# Altium PCB PCB1.PcbDoc
Units mil, origin at the board's own origin, x right, y up, seen from the top; angles counter-clockwise.
Board outline 3280 x 2470 mil, 2 copper layers (Top Layer, Bottom Layer); 51 components, 30 nets, 184 pads, 29 vias.
Unrouted connection lines stored in the file: 25.
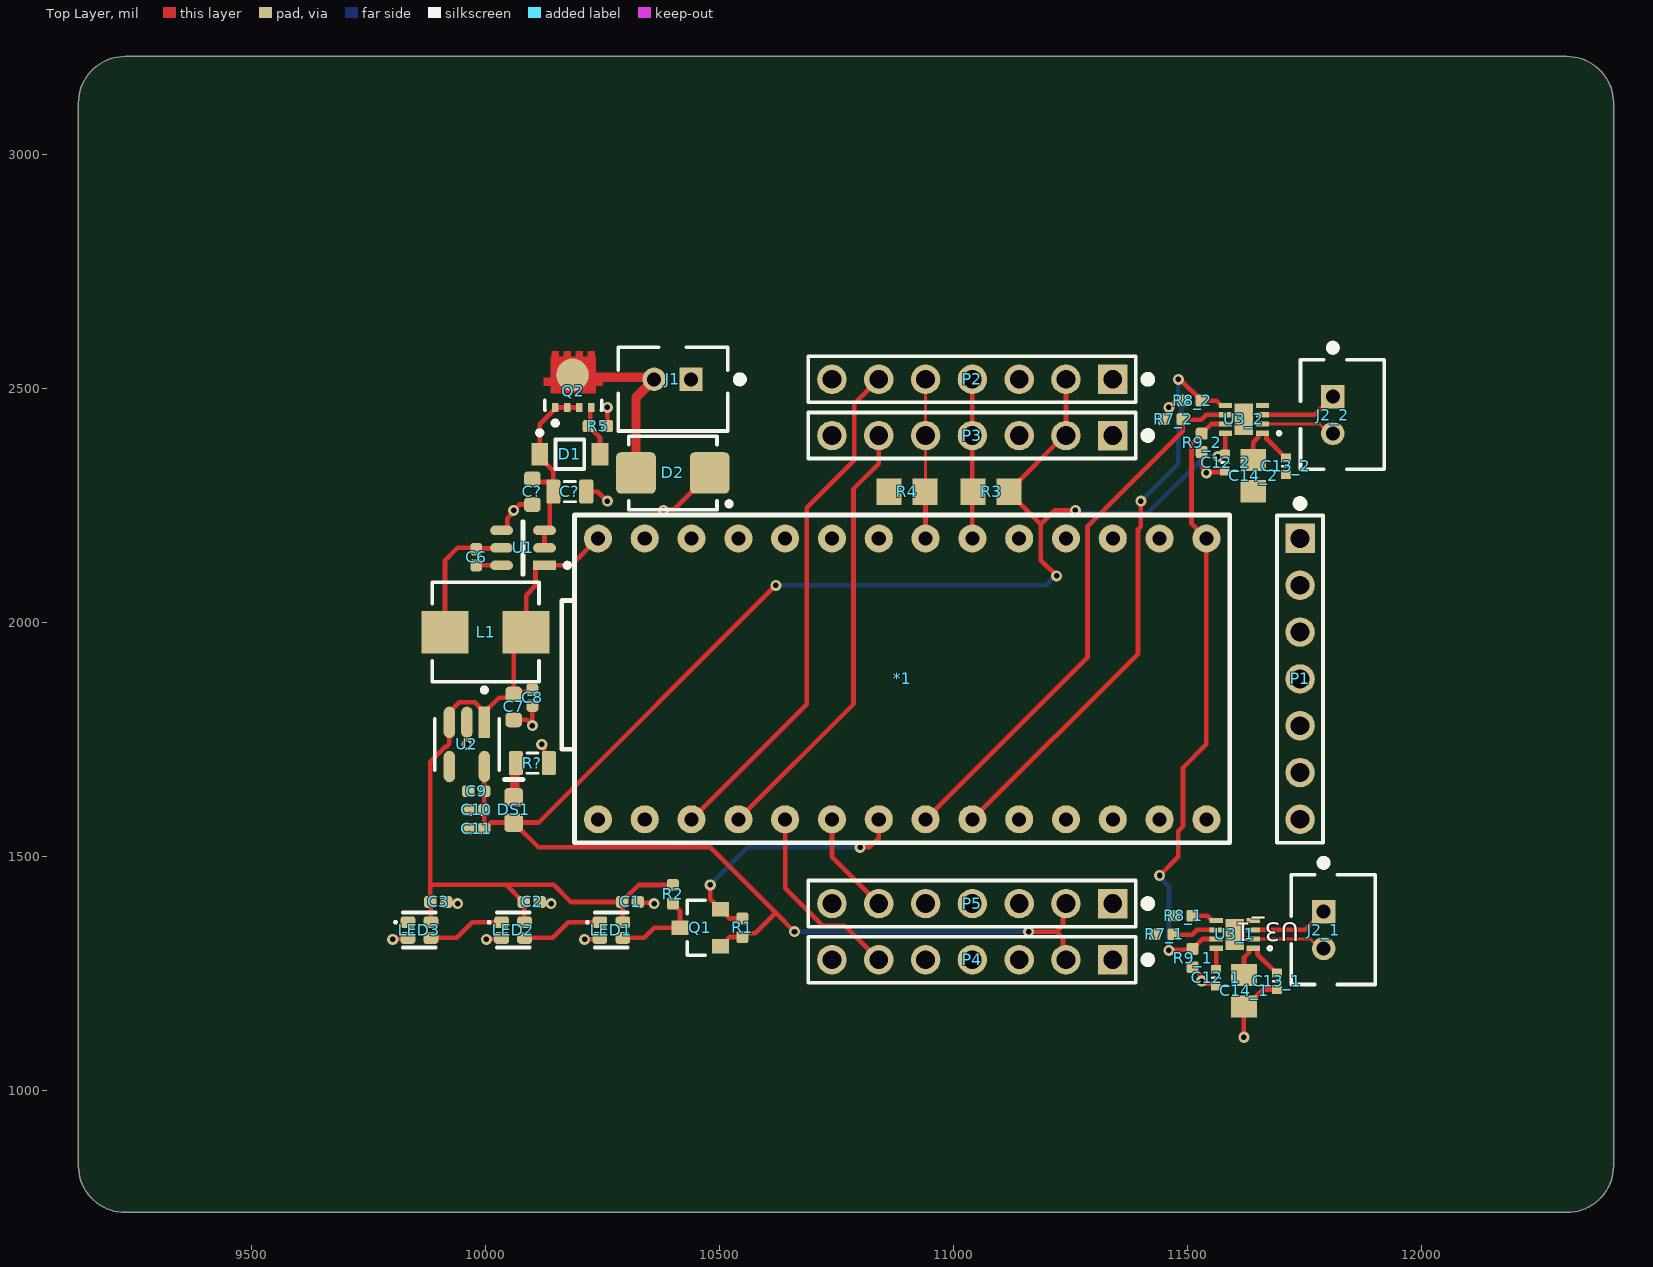
[diagram p0: Top Layer view]
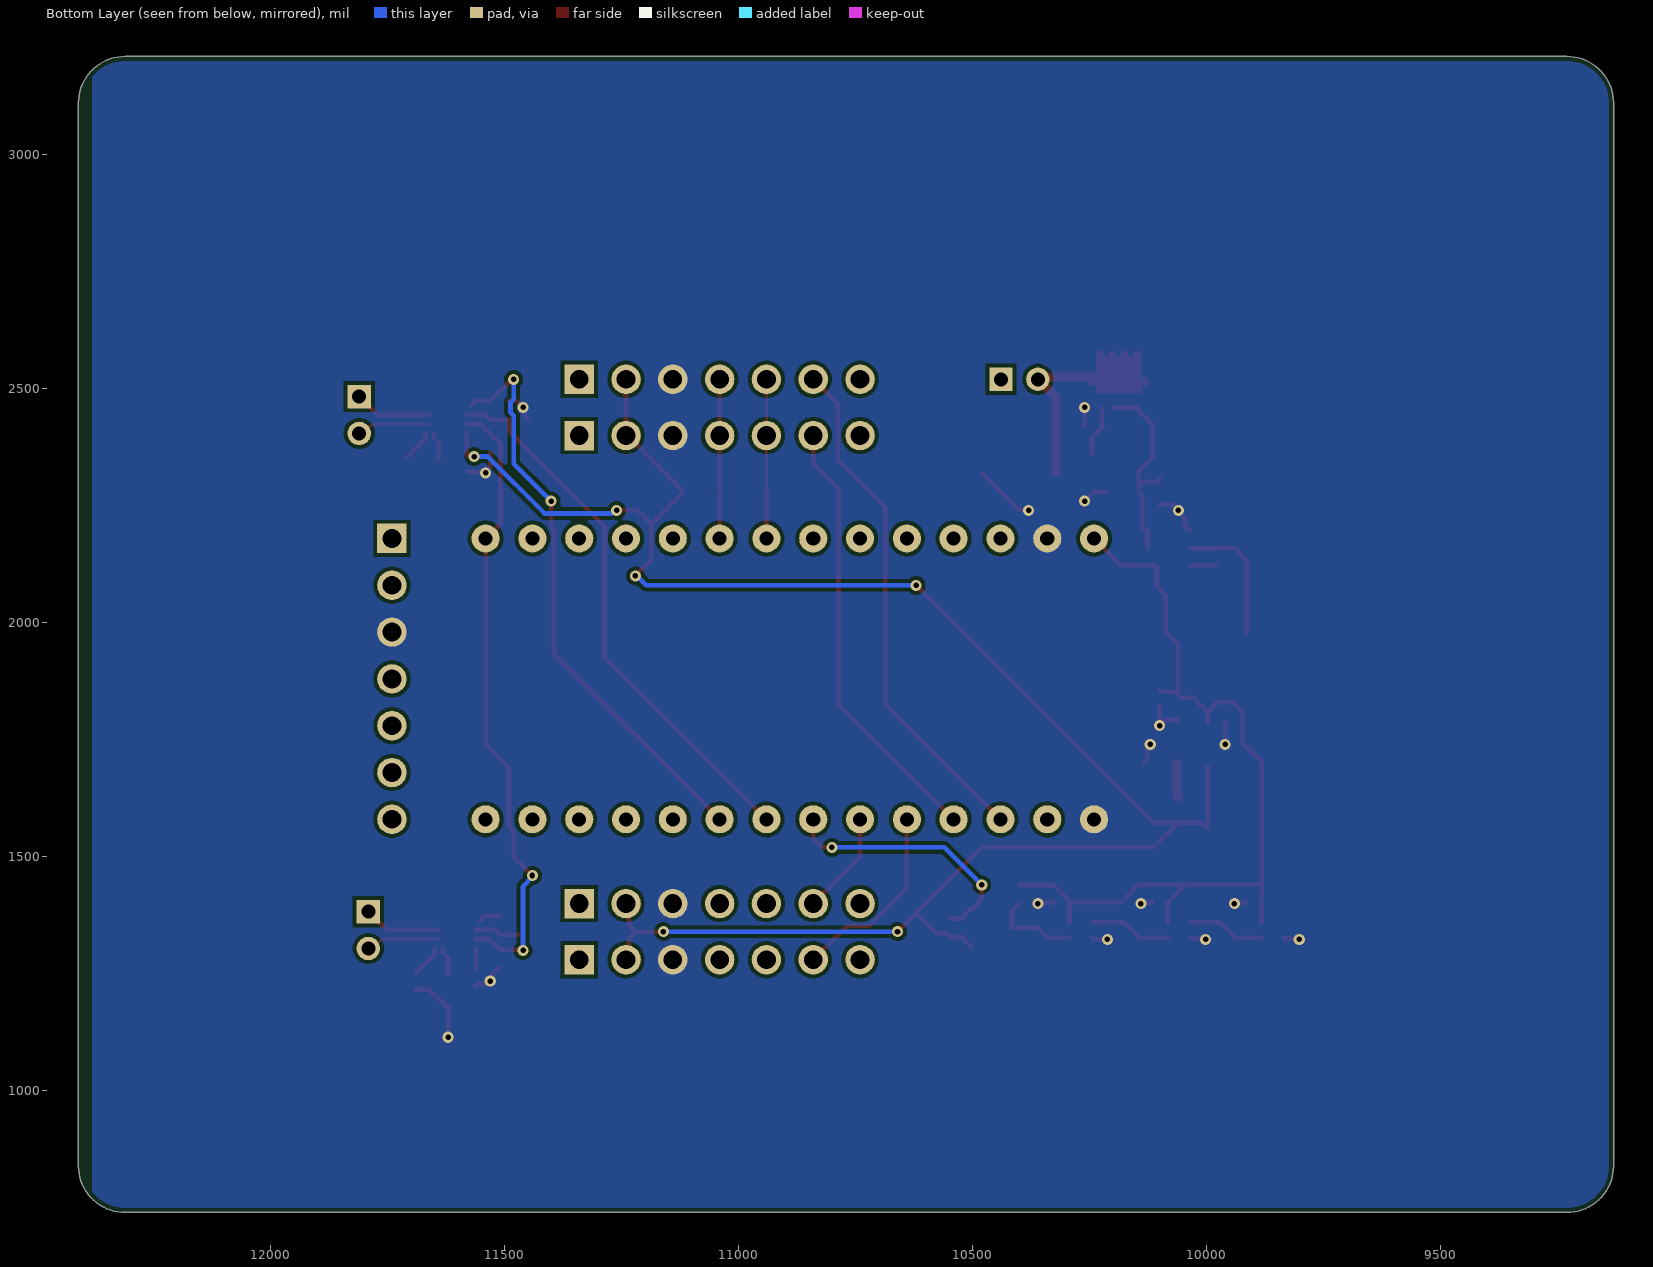
[diagram p1: Bottom Layer view, seen from below]
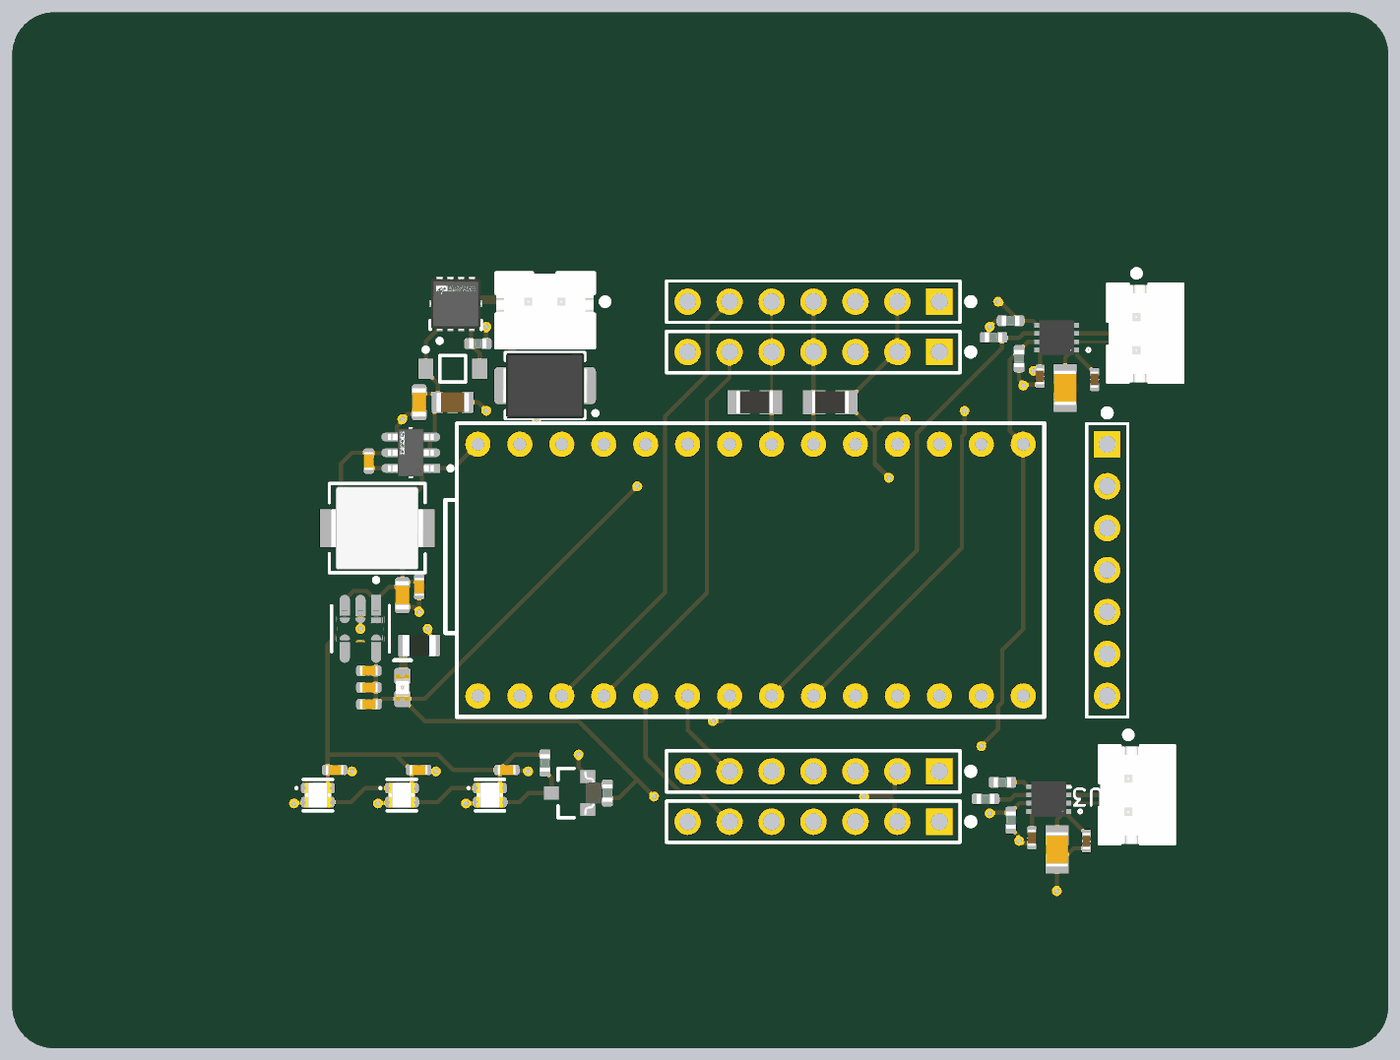
[diagram p2: 3D render of the assembled board from above, using the file's embedded part models]

## Layer stack, top to bottom
Top Solder: solder mask 0.4, Solder Resist, Dk 3.5
Top Layer: signal copper 1.4
Dielectric 1: dielectric 12.6, FR-4, Dk 4.8
Bottom Layer: signal copper 1.4
Bottom Solder: solder mask 0.4, Solder Resist, Dk 3.5

## Board outline
9130,840 ccw(c9230,840) 9230,740 12310,740 ccw(c12310,840) 12410,840 12410,3110 ccw(c12310,3110) 12310,3210 9230,3210 ccw(c9230,3110) 9130,3110

## Design rules (kind name [scope] priority, off if disabled: settings)
BoardOutlineClearance [All] p1: gap=10 ignorepadtopadclearanceinfootprint=FALSE except(0: Arc-SplitContinuation Track-SplitContinuation SMDPad-SplitContinuation THPad-SplitContinuation Via-SplitContinuation Fill-SplitContinuation Poly-SplitContinuation Region-SplitContinuation Text-SplitContinuation)
Clearance [All] p1: gap=7.87 ignorepadtopadclearanceinfootprint=TRUE except(3.94: Arc-SMDPad Track-SMDPad; 5.91: Arc-Text Track-Text SMDPad-SMDPad SMDPad-Text THPad-Text Via-Text Fill-Text Poly-Text Region-Text; 9.84: Arc-Via Track-Via; 10: SMDPad-THPad SMDPad-Via THPad-THPad THPad-Via Via-Via Text-Text; 11.02: Arc-THPad Track-THPad)
DiffPairsRouting [All] p1: maxlimit=7.87 minlimit=7.87 mostfreqgap=7.87 toplayer_minwidth=15 toplayer_maxwidth=21.19 toplayer_prefwidth=21.19 bottomlayer_minwidth=15 bottomlayer_maxwidth=21.19 bottomlayer_prefwidth=21.19 impedanceprofiledriven=TRUE impedanceprofileid={89AA14D4-A2A4-49F1-A537-A2CA9A9DB853} maxuncoupledlength=500
Height [All] p1: minheight=0 maxheight=99999 prefheight=500
HoleSize [All] p1: absolutevalues=TRUE maxlimit=196.85 minlimit=1 maxpercent=80.000 minpercent=20.000
MinimumSolderMaskSliver [All] p1: minsoldermaskwidth=3.94
PlaneConnect [All] p1: planeconnectstyle=Direct reliefexpansion=20 reliefentries=4 reliefconductorwidth=10 reliefairgap=10
PolygonConnect [All] p1: connectstyle=Direct reliefconductorwidth=10 reliefentries=4 polygonreliefangle="90 Angle" airgapwidth=10
RoutingVias [All] p1: holewidth=11.81 width=23.62 viastyle="Through Hole" minholewidth=11.81 minwidth=19.68 maxholewidth=11.81 maxwidth=31.5
SilkToSolderMaskClearance [IsPad] p1: minsilkscreentomaskgap=2.01 clearancetoexposedcopper=TRUE
SolderMaskExpansion [All] p1: expansion=1.5 istentingtop=FALSE
SupplyNets "Schematic Supply Nets_12" [InNet('P5V0')] p1: voltage=0.000
SupplyNets "Schematic Supply Nets_11" [InNet('VINUP')] p2: voltage=0.000
SupplyNets "Schematic Supply Nets_1" [InNet('VIN')] p3: voltage=0.000
SupplyNets "Schematic Supply Nets_6" [InNet('GND')] p4: voltage=0.000
SupplyNets "Schematic Supply Nets_2" [InNet('P3V3')] p5: voltage=0.000
UnRoutedNet [All] p1: checkbadconnections=TRUE
Width [All] p1: maxlimit=590.55 minlimit=6.3 preferedwidth=10 minimp=50.000000 maximp=50.000000 favimp=50.000000
23 further rules are at their usual default settings.

## Classes and differential pairs
channel class MotorControl: U_MotorControl1 U_MotorControl2
component class U_Power: C6 C7 C8 C9 C10 C11 C? D1 D2 DS1 J1 L1 Q2 R5 R? U1 U2
component class U_MotorControl2: C12_2 C13_2 C14_2 J2_2 R7_2 R8_2 R9_2 U3_2
component class U_MotorControl1: C12_1 C13_1 C14_1 J2_1 R7_1 R8_1 R9_1 U3_1
component class U_Microcontroller: *1
component class U_GPIO: C1 C2 C3 LED1 LED2 LED3 P1 P2 P3 P4 P5 Q1 R1 R3 R4

## Components (designator, comment, footprint, x,y, rotation, side; value= is the part's Value field where it differs from the comment)
*1 "TEENSY40" TEENSY40-Footprint-1 10190,1530 r0 top
C1 "100n 16V X7R 0402" C0402 10308.64,1403.37 r0 top value=100nF
C2 "100n 16V X7R 0402" C0402 10098.64,1403.37 r0 top value=100nF
C3 "100n 16V X7R 0402" C0402 9898.64,1403.37 r0 top value=100nF
C6 "100n 16V X7R 0402" C0402 9980,2140 r270 top value=100nF
C7 "22uF 10V 0603 X5R" C0603 10060,1820 r270 top value=22uF
C8 "1uF 16V X5R 0402" C0402 10100,1840 r270 top value=1u
C9 "1uF 16V X5R 0402" C0402 9980,1640 r180 top value=1u
C10 "1uF 16V X5R 0402" C0402 9980,1600 r180 top value=1u
C11 "1uF 16V X5R 0402" C0402 9980,1560 r180 top value=1u
C12_1 "Capacitor 100nF +/-20% 25V 0402" CAPC0402(1005)60_L 11560.5,1241.68 r90 top value=100nF (schematic designator C12)
C12_2 "Capacitor 100nF +/-20% 25V 0402" CAPC0402(1005)60_L 11580,2342.15 r90 top value=100nF (schematic designator C12)
C13_1 "Capacitor 100nF +/-20% 25V 0402" CAPC0402(1005)60_L 11690.5,1233.96 r90 top value=100nF (schematic designator C13)
C13_2 "Capacitor 100nF +/-20% 25V 0402" CAPC0402(1005)60_L 11710,2334.44 r90 top value=100nF (schematic designator C13)
C14_1 "Capacitor 10 uF +/- 10% 16 V 0805" CAPC2013X135X45NL10T25 11620.5,1213.96 r90 top value=10µF (schematic designator C14)
C14_2 "Capacitor 10 uF +/- 10% 16 V 0805" CAPC2013X135X45NL10T25 11640,2314.44 r90 top value=10µF (schematic designator C14)
C? "Capacitor 47µF +/-40% 6.3V 0805" CAPC0805(2012)145_L 10180,2280 r0 top value=47µF
C? "10uF 35V 0603" C0603 10100,2280 r270 top value=10u
D1 "MMSZ10T1G" ONSC-SOD-123-2-425-04_V 10180,2360 r0 top
D2 "SMBJ17CA" DO214-AA 10400,2320 r180 top
DS1 "KT-0603W" LED0603 10060,1600 r90 top
J1 "CONN-00048" JST_PHR_2_0 10438.74,2520 r180 top
J2_1 "CONN-00048" JST_PHR_2_0 11790.5,1382.7 r270 top (schematic designator J2)
J2_2 "CONN-00048" JST_PHR_2_0 11810,2483.18 r270 top (schematic designator J2)
L1 "4.7uH 4.5A FXL0530-4R7-M" INDP5452X30N 10000,1980 r0 top value=4u7
LED1 "XL-1615RGBC-WS2812B" XL-1615RGBC-WS2812B-Footprint-1 10268.64,1343.37 r0 top
LED2 "XL-1615RGBC-WS2812B" XL-1615RGBC-WS2812B-Footprint-1 10058.64,1343.37 r0 top
LED3 "XL-1615RGBC-WS2812B" XL-1615RGBC-WS2812B-Footprint-1 9858.64,1343.37 r0 top
P1 "CONN-00105" HDDR_7x1_0 11740,1880 r270 top
P2 "CONN-00105" HDDR_7x1_0 11040,2520 r180 top
P3 "CONN-00105" HDDR_7x1_0 11040,2400 r180 top
P4 "CONN-00105" HDDR_7x1_0 11040,1280 r180 top
P5 "CONN-00105" HDDR_7x1_0 11040,1400 r180 top
Q1 "2N7002H6327XTSA2" FP-PG-SOT23-3-MFG 10458.64,1348.37 r180 top
Q2 "AONR21321" FP-DFN3x3A_8L_EP1_P-MFG 10187.2,2515.12 r0 top
R1 "1k 1% 0402" R0402 10548.64,1348.37 r90 top value=1k
R2 "1k 1% 0402" R0402 10400,1420 r270 top value=1k
R3 "Resistor 4k7 +/-1% 0805 125 mW" RESC2013X70X40ML20T20 11080,2280 r0 top value=4.7k
R4 "Resistor 4k7 +/-1% 0805 125 mW" RESC2013X70X40ML20T20 10900,2280 r180 top value=4.7k
R5 "10k 1% 0402" R0402 10240,2420 r180 top value=10k
R7_1 "10k 1% 0402" R0402 11450,1334.44 r0 top value=10k (schematic designator R7)
R7_2 "10k 1% 0402" R0402 11469.5,2434.91 r0 top value=10k (schematic designator R7)
R8_1 "10k 1% 0402" R0402 11490.5,1373.96 r0 top value=10k (schematic designator R8)
R8_2 "10k 1% 0402" R0402 11510,2474.44 r0 top value=10k (schematic designator R8)
R9_1 "10k 1% 0402" R0402 11510.5,1283.65 r90 top value=10k (schematic designator R9)
R9_2 "10k 1% 0402" R0402 11530,2384.12 r90 top value=10k (schematic designator R9)
R? "Resistor 1K +/-5% 0805 125 mW" RESC0805(2012)_L 10100,1700 r0 top value=1k
U1 "AP63205WU-7" FP-TSOT26-IPC_B 10080,2160 r180 top
U2 "AP2112K-3.3TRG1" FP-SOT25-IPC_A 9960,1740 r270 top
U3_1 "DRV8212PDSGR" WSON8_DSG_TEX 11600.5,1333.96 r180 top (schematic designator U3)
U3_2 "DRV8212PDSGR" WSON8_DSG_TEX 11620,2434.44 r180 top (schematic designator U3)

## Footprints (in the part's own frame and the unit in brackets; to place one, negate y for a bottom-side part, rotate by r counter-clockwise, add the part's x,y. Pads: shape width x height; smd on the part's side, far side on the other; paste and mask are expansions set on the pad)
C0402 [mm] "Chip Capacitor, 2-Leads, Body 1.00x0.50mm, IPC Medium Density"
  rrect50% 0.68x0.64 smd: 1(-0.43,0) 2(0.43,0)
  body extent -0.55,-0.3 0.55,0.3, height 0.6
C0603 [mm] "Chip Capacitor, 2-Leads, Body 1.60x0.75mm, IPC Medium Density"
  rrect50% 0.8x0.9 smd: 1(-0.7,0) 2(0.7,0)
  body extent -0.87,-0.43 0.87,0.43, height 0.8
CAPC0402(1005)60_L [mm] "Chip Capacitor, Body 1.0x0.5mm, Height 0.6mm, IPC High Density"
  rrect25% 0.5x0.55 smd: 1(-0.45,0) 2(0.45,0)
  silkscreen extent 0,-0.2 0,0.2, body extent -0.5,-0.25 0.5,0.25, height 0.6
CAPC0805(2012)145_L [mm] "Chip Capacitor, Body 2.0x1.2mm, Height 1.45mm, IPC High Density"
  rrect25% 0.76x1.3 smd: 1(-0.9,0) 2(0.89,0)
  silkscreen extent -0.3,-0.55 0.3,0.55, body extent -1,-0.6 1,0.6, height 1.45
CAPC2013X135X45NL10T25 [mm] "Chip Capacitor, 2-Leads, Body 2.10x1.35mm, IPC Medium Density"
  rect 1.2x1.4 smd: 1(-0.85,0) 2(0.85,0)
  body extent -1.05,-0.67 1.05,0.67, height 1.35
DO214-AA [mm] "DO214-AA Diode Package"
  rrect25% 2.16x2.25 smd: 1(-2,0) 2(2,0)
  silkscreen extent -3.18,-2 2.4,2, body extent -2.6,-1.97 2.6,1.97, height 2.61
FP-DFN3x3A_8L_EP1_P-MFG [mm]
  rect 0.35x0.5 smd paste+0 mask+0: 1(-0.975,-1.4) 2(-0.325,-1.4) 3(0.325,-1.4) 4(0.975,-1.4)
  round 1.769 smd paste+0 mask+0: 5-6-7-8(-0.038,0.367)
  Top Layer region: -1.225,-0.63 -1.225,-0.215 -1.605,-0.215 -1.605,0.215 -1.225,0.215 -1.225,1.35 -1.175,1.35 -1.175,1.65 -0.775,1.65 -0.775,1.35 -0.525,1.35 -0.525,1.65 -0.125,1.65 -0.125,1.35 0.125,1.35 0.125,1.65 0.525,1.65 0.525,1.35 0.775,1.35 0.775,1.65 1.175,1.65 1.175,1.35 1.225,1.35 1.225,0.215 1.605,0.215 1.605,-0.215 1.225,-0.215 1.225,-0.63
  silkscreen extent -1.55,-2.37 1.55,-1.01, body extent -1.71,-1.75 1.71,1.75, height 0.25
FP-PG-SOT23-3-MFG [mm]
  rect 0.9x0.8 smd paste+0 mask+0: 1(-1.1,1) 2(-1.1,-1) 3(1.1,0)
  silkscreen extent -0.28,-1.5 0.7,1.5, body extent -1.65,-1.6 1.65,1.6, height 0.25
FP-SOT25-IPC_A [mm]
  rect 1.707x0.616 smd paste+0 mask+0: 1(-1.201,0.95)
  rrect100% 1.707x0.616 smd paste+0 mask+0: 2(-1.201,0) 3(-1.201,-0.95) 4(1.201,-0.95) 5(1.201,0.95)
  silkscreen extent -3.08,-1.75 1.4,1.75, body extent -2.55,-2 2.55,2, height 0.25
FP-TSOT26-IPC_B [mm]
  rect 1.24x0.526 smd paste+0 mask+0: 1(-1.165,0.95)
  rrect100% 1.24x0.526 smd paste+0 mask+0: 2(-1.165,0) 3(-1.165,-0.95) 4(1.166,-0.95) 5(1.166,0) 6(1.166,0.95)
  silkscreen extent -2.53,-1.45 0.05,1.45, body extent -2.04,-1.7 2.04,1.7, height 0.25
HDDR_7x1_0 [mm]
  rect 1.6x1.6 hole 1.016: 1(-7.62,0)
  round 1.6 hole 1.016: 2(-5.08,0) 3(-2.54,0) 4(0,0) 5(2.54,0) 6(5.08,0) 7(7.62,0)
  silkscreen extent -9.72,-1.25 8.9,1.25, body extent -8.89,-1.27 8.89,1.27, height 8.54
INDP5452X30N [mm] "Precision Wire Wound Inductor, 2-Leads, Body 5.40x5.20mm, IPC Medium Density"
  rect 2.55x2.3 smd: 1(-2.2,0) 2(2.2,0)
  silkscreen extent -2.9,-2.7 2.9,2.7, body extent -2.8,-2.5 2.8,2.5, height 3
JST_PHR_2_0 [mil]
  rect 50x50 hole 30: 1(0,0)
  round 50 hole 30: 2(78.74,0)
  silkscreen extent -112,-69 156,110, body extent -77,-69 156,110, height 236
LED0603 [mm] "0603 LED"
  rrect35% 1x1 smd: 1(0.685,0) 2(-0.685,0)
  silkscreen extent 1.65,-0.51 1.65,0.51, body extent -0.8,-0.4 0.8,0.4, height 0.55
ONSC-SOD-123-2-425-04_V [mm] "SOD, 2-Leads, Body 2.69x1.6mm"
  rect 0.91x1.22 smd: 1(-1.635,0) 2(1.635,0)
  silkscreen extent -1.76,-0.8 0.78,1.28, body extent -1.35,-0.8 1.35,0.8, height 1.35
R0402 [mm] "R0402"
  rrect35% 0.65x0.65 smd: 1(-0.5,0) 2(0.5,0)
  body extent -0.53,-0.29 0.53,0.29, height 0.38
RESC0805(2012)_L [mm] "Chip Resistor, Body 2.0x1.3mm, IPC High Density"
  rrect25% 0.76x1.3 smd: 1(-0.9,0) 2(0.89,0)
  silkscreen extent -0.3,-0.55 0.3,0.55, body extent -1,-0.62 1,0.63, height 0.6
RESC2013X70X40ML20T20 [mm] "Chip Resistor, 2-Leads, Body 2.2x1.35mm, IPC Low Density"
  rect 1.35x1.45 smd: 1(-0.975,0) 2(0.975,0)
  body extent -1.1,-0.67 1.1,0.67, height 0.7
TEENSY40-Footprint-1 [mil]
  round 60 hole 30: 0(150,50) 1(250,50) 2(350,50) 3(450,50) 3V3(250,650) 4(550,50) 5(650,50) 6(750,50) 7(850,50) 8(950,50) 9(1050,50) 10(1150,50) 11(1250,50) 12(1350,50) 13(1350,650) 14(1250,650) 15(1150,650) 16(1050,650) 17(950,650) 18(850,650) 19(750,650) 20(650,650) 21(550,650) 22(450,650) 23(350,650) GND1(50,50) GND2(150,650) Vin(50,650)
  silkscreen extent -28,0 1400,700
WSON8_DSG_TEX [mil]
  rect 28x11 smd paste+0 mask+0: 1(-39.5,29.53) 2(-39.5,9.84) 3(-39.5,-9.84) 4(-39.5,-29.53) 5(39.5,-29.53) 6(39.5,-9.84) 7(39.5,9.84) 8(39.5,29.53)
  rect 39x67 smd paste+0 mask+0: 9(0,0)
  silkscreen extent -79,26 -71,34, body extent -41,-41 41,41, height 32
XL-1615RGBC-WS2812B-Footprint-1 [mm]
  rrect50% 0.8x0.65 smd mask+0.05: 1(-0.625,0.425) 2(0.625,0.425) 3(-0.625,-0.425) 4(0.625,-0.425)
  silkscreen extent -1.36,-0.95 0.89,0.95, body extent -0.8,-0.75 0.8,0.75, height 0.7

## Part data
*1: library part CMP-020-00024-3, "PJRC Teensy 4.0 USB Development Board"
C1 C2 C3 C6: library part CMP-001-00088-6, "100nF 16V X7R ±10% 0402 Multilayer Ceramic Capacitors MLCC - SMD/SMT ROHS", Dielectric=X7R, LCSC Part #=C1525, Package=0402, Voltage=16V
C7: library part CMP-001-00110-2, "10V 22uF X5R ±20% 0603 Multilayer Ceramic Capacitors MLCC - SMD/SMT ROHS", Dielectric=X5R, LCSC Part #=C86295, Package=0603, Voltage=10V
C8 C9 C10 C11: library part CMP-001-00098-3, "16V 1uF X5R ±10% 0402 Multilayer Ceramic Capacitors MLCC - SMD/SMT ROHS", Dielectric=X5R, LCSC Part #=C29266, Package=0402, Voltage=16V
C12_1 C12_2 C13_1 C13_2: library part CMP-001-00065-3, "Chip Capacitor, 100nF +/-20%, 25V, 0402, Thickness 0.6 mm", Case/Package=0402, Max Operating Temperature=85°C, Min Operating Temperature=-55°C, Tolerance=10%, Voltage Rating=25V, Mounting Technology=SMT, Pins=2
C14_1 C14_2: library part CMP-001-00015-7, "Chip Capacitor, 10 uF, +/- 10%, 16 V, 0805 (2012 Metric)", Capacitor Type=Ceramic, Case/Package=0805, Max Operating Temperature=85°C, Min Operating Temperature=-55°C, Tolerance=10%, Voltage Rating=16V, Mounting Technology=SM, Pins=2, RoHS Compliant=True
C?: library part CMP-001-00082-3, "Chip Capacitor, 47µF +/-40%, 6.3V, 0805, Thickness 1.45 mm", Case/Package=0805, Max Operating Temperature=85°C, Min Operating Temperature=-55°C, Tolerance=10%, Voltage Rating=6.3V, Mounting Technology=SMT, Pins=2
C?: library part CMP-001-00102-3, "35V 10uF X5R ±20% 0603 Multilayer Ceramic Capacitors MLCC - SMD/SMT ROHS", Dielectric=X5R, LCSC Part #=C194427, Package=0603, Voltage=35V
D1: library part CMP-1060-00410-1, "Zener Voltage Regulator, 500 mW, 2-Pin SOD-123, Pb-Free, Tape and Reel", Manufacturer="On Semiconductor", ComponentLink1Description="Manufacturer URL", ComponentLink1URL=http://www.onsemi.com/, ComponentLink2Description=Datasheet, ComponentLink2URL=http://www.onsemi.com/pub_link/Collateral/MMSZ2V4T1-D.PDF, ComponentLink3Description="Package Specification", ComponentLink3URL=http://www.onsemi.com/pub_link/Collateral/425-04.PDF, DatasheetVersion="Rev. 11", Mounting Technology="Surface Mount", P Max (W)=0.5, PackageDescription="2-Pin SOD, Body 1.6 x 2.69 mm", PackageReference=SOD-123-2-425-04, PackageVersion="Rev. G, 10/2009", Packing="Tape and Reel", PartNumber=MMSZ10T1G, RoHS=Pb-Free
D2: library part CMP-004-00048-1, "Trans Voltage Suppressor Diode, 600W, 17V V(RWM), Bidirectional, 1 Element, Silicon", Max Operating Temperature=170°C, Min Operating Temperature=-55°C
DS1: library part CMP-00026-00001-1, Case/Package=0603, Forward Voltage Max=3.1, Forward Voltage Min=2.6, Pins=2
J1 J2_1 J2_2: library part CMP-019-000047-1, "JST PH 2x1, THT, 2.00mm Pitch", Manufacturer=JST, Manufacturer PN=B2B-PH-K, Component Type=Standard, Cost=0.19, Design Item ID=CONN-00048, Levels=1, Part Number=CONN-00048, Pin Count=2, Positions per level=2, Source=Connectors$.SchLib, Type=Header
L1: library part CMP-006-00030-1, "4.5A 4.7uH Integrated molded inductor ±20% 5A SMD,5.2x5.4mm Power Inductors ROHS", LCSC Part #=C177246, Saturation Current=5A
LED1 LED2 LED3: library part CMP-007-00038-3, "1615  RGB LEDs(Built-in IC) ROHS", LCSC Part #=C5349954, Package=SMD-4P,1.6x1.5mm, LED Type=Addressable
P1 P2 P3 P4 P5: library part CMP-019-000100-1, "Header, 7x1, 0.1\"", Manufacturer=Samtec, Manufacturer PN=TSW-107-07-F-S, Component Type=Standard, Cost=0.61, Design Item ID=CONN-00105, Levels=1, Part Number=CONN-00105, Pin Count=7, Positions per level=7, Source=Connectors$.SchLib, Type=Header
Q1: library part CMP-32901-000180-1, "MOSFET N-CH 60V 0.3A SOT23", Case/Package=SOT-23, Continuous Drain Current (ID)=300mA, Drain to Source Voltage (Vdss)=60V, Gate to Source Voltage (Vgs)=20V, Input Capacitance=20pF, Max Operating Temperature=150°C, Max Power Dissipation=500mW, Min Operating Temperature=-55°C, Halogen Free="Halogen Free", Lead Free="Lead Free", Max Dual Supply Voltage=60V, Mount="Surface Mount", Number of Pins=3, Packaging="Tape and Reel", Rds On Max=3R, Rise Time=3.3ns
Q2: library part CMP-83955-000004-1, "MOSFET P-CH 30V 3X3 DFN EP", Continuous Drain Current=-24A, Drain To Source Breakdown Voltage=-30V, Drain To Source Resistance=13.5mΩ, Gate To Source Voltage=25V, Input Capacitace At Vds="1180pF @ -15V", Manufacturer="Alpha & Omega Semiconductor", Max Forward Diode Voltage=-1V, Max Junction Temp=+150°C, Package=DFN3x3A_8L_EP1_P, Power Dissipation=4.1W, Pulse Drain Current=-66A, Temperature="-55°C to +150°C", Temperature Range Low=-55°C, Typ Forward Diode Voltage=-0.72V, Automotive=No, Category=Trans, ComponentLink2Description=Datasheet, ComponentLink2URL=http://www.aosmd.com/pdfs/datasheet/AONR21321.pdf, Depletion Mode=False, Device Class L1="Discrete Semiconductors", Device Class L2=Transistors, Device Class L3=MOSFETs, Digikey Description="MOSFET P-CH 30V 3X3 DFN EP", Drain To Source Voltage=-30V, Footprint Url=http://www.aosmd.com/res/packaging_information/DFN3x3-8L.pdf, Gate Charge At Vgs="21nC @ -10V", Height=0.9mm, Lead Free=Yes, Manufacturer Part Number=AONR21321, Number Of Channels=1, Number Of P Channels=1, Octopart=https://octopart.com/aonr21321-alpha+%26+omega+semiconductor-96014005, Reverse Recovery Charge=15nC, Reverse Recovery Time=10ns, RoHS=TRUE, Rthja Max=60°C/W, Standoff Height=0mm, Temperature Range High=+150°C, Threshold Vgs Max=-2.3V, Threshold Vgs Min=-1.3V, Transconductance=25S, Turn Off Delay Time=30ns, Turn On Delay Time=10.5ns
R1 R2: library part CMP-009-00189-3, "62.5mW Thick Film Resistors 50V ±100ppm/℃ ±1% 1kΩ 0402 Chip Resistor - Surface Mount ROHS", LCSC Part #=C106235, Package=0402, Tolerance=1%
R3 R4: library part CMP-009-00032-4, "Chip Resistor, 4.7 KOhm, +/- 1%, 0.125 W, -55 to 155 degC, 0805 (2012 Metric)", Case/Package=0805, Max Operating Temperature=155°C, Min Operating Temperature=-55°C, Power=125mW, Tolerance=1%, Voltage Rating=150V, Mounting Technology=SM, Pins=2, RoHS Compliant=True
R5 R7_1 R7_2 R8_1 R8_2 R9_1 R9_2: library part CMP-009-00187-3, "62.5mW Thick Film Resistors 50V ±100ppm/℃ ±1% 10kΩ 0402 Chip Resistor - Surface Mount ROHS", LCSC Part #=C60490, Package=0402, Tolerance=1%
R?: library part CMP-009-00118-2, "Chip Resistor, 1 kOhms, +/-5%, 125 mW, -55 to 155 degC, 0805", Case/Package=0805, Max Operating Temperature=155°C, Min Operating Temperature=-55°C, Power=125mW, Tolerance=5%, Pins=2
U1: library part CMP-019-00066-4, "Switching Regulator"
U2: library part CMP-12756-000035-1, "IC REG LINEAR 3.3V 600MA SOT25", Case/Package=SOT-23-5, Dropout Voltage=250mV, Max Input Voltage=6V, Max Operating Temperature=85°C, Max Output Current=600mA, Min Input Voltage=2.5V, Min Operating Temperature=-40°C, Output Voltage=3.3V, Package Quantity=1, Quiescent Current=55uA, Accuracy=1.5%, Height=1.3mm, Lead Free="Lead Free", Length=3.1mm, Mount="Surface Mount", Number of Outputs=1, Number of Pins=5, Number of Regulators=1, Output Current=600mA, Output Type=Fixed, Packaging="Tape and Reel", Polarity=Positive, Width=1.7mm
U3_1 U3_2: library part CMP-152-000000-2, "12-V, 3-A H-bridge motor driver, PWM control&nbsp;with low power sleep mode 8-WSON -40 to 125", Manufacturer_Name="Texas Instruments", Copyright="Copyright (C) 2026 Ultra Librarian. All rights reserved.", Design Item ID=DRV8212PDSGR, Manufacturer_Part_Number=DRV8212PDSGR, RefDes=RefDes, Source=DRV8212PDSGR.SchLib, Type=Type

## Via types
v1: diameter 23.62, hole 11.81, Top Layer to Bottom Layer, 29 vias

## Nets (pads, with @x,y where several pads share a name; then routed paths per layer and width w, separated by ;. In a path a pad name is that pad's centre, name@x,y a point inside that pad or via, vN(x,y) a via of type N, cw(c..) or ccw(c..) an arc to the next point about the centre after c; other vN are vias at no path point)
GND: *1.GND1 *1.GND2 C1.2 C2.2 C3.2 C7.2 C8.2 C9.2 C10.2 C11.2 C12_1.1 C12_2.1 C13_1.1 C13_2.1 C14_1.1 C14_2.1 C?.2 D2.1 LED1.3 LED2.3 LED3.3 P1.3 P2.3 P3.3 P4.3 P5.3 R5.1 R7_1.1 R7_2.1 R8_1.1 R8_2.1 R9_1.1 R9_2.1 R?.2 U1.4 U2.2 U3_1.4 U3_1.9 U3_2.4 U3_2.9 | length 1078.9
  Top Layer w10: v1(9801.63,1323.68) 9803.11,1325.16 9832.56,1325.16 LED3.3 ; C3.2 9917.25,1401.68 9938.32,1401.68 v1(9940,1400) ; v1(9960,1740) U2.2 ; v1(10001.63,1323.68) 10003.11,1325.16 10032.56,1325.16 LED2.3 ; U1.4 10036.03,2197.4 10040.97,2202.35 10046.44,2202.35 10046.44,2222.75 10060,2236.31 10060,2240.29 10072.15,2252.44 C?.2@10100,2252.44 ; C7.2 10087.56,1792.44 v1(10100,1780) C8.2 ; C2.2 10117.25,1401.68 10138.32,1401.68 v1(10140,1400) ; v1(10120,1740) 10120,1736.31 10125.08,1731.24 10125.08,1709.96 R?.2 ; v1(10211.63,1323.68) 10241.08,1323.68 LED1.3 ; C?.2@10215.04,2280 10240,2280 v1(10260,2260) ; R5.1 10259.84,2420.16 10259.84,2459.84 v1(10260,2460) ; C1.2 10327.25,1401.68 10358.32,1401.68 v1(10360,1400) ; v1(10380,2240) 10382.61,2242.61 10403.12,2242.61 10478.74,2318.23 D2.1 ; R7_2.1 11457.39,2442.49 11457.39,2457.39 v1(11460,2460) 11474.44,2474.44 R8_2.1 ; R9_1.1 11527.39,1247.07 11527.39,1237.04 v1(11530,1234.44) 11533.69,1234.44 11539.32,1228.81 11555.66,1228.81 C12_1.1 ; R9_2.1 11530,2333.69 11540,2323.69 v1(11540,2320) 11542.22,2322.22 11577.78,2322.22 C12_2.1 ; v1(11620,1114.44) 11620,1180 C14_1.1 11624.44,1180.5 11660.19,1216.25 C13_1.1
  other v1: 10060,2240
Net*1_0: *1.0 P1.6
Net*1_1: *1.1 P2.6 | length 1105.7
  Top Layer w10: *1.1 10686.02,1826.02 10686.02,2246.02 10787.52,2347.52 10787.52,2467.52 P2.6
Net*1_2: *1.2 P3.6 | length 944.3
  Top Layer w10: *1.2 10786.02,1826.02 10786.02,2286.02 10840,2340 P3.6
Net*1_3: *1.3 P4.6 | length 410.5
  Top Layer w10: *1.3 10640,1432.8 10720.32,1352.48 10767.52,1352.48 P4.6
Net*1_4: *1.4 P5.6 | length 221.4
  Top Layer w10: *1.4 10740,1500 P5.6
Net*1_5: *1.5 Q1.2 R1.2 | length 559.9
  Top Layer w10: v1(10480,1440) 10480,1409.69 10489.23,1400.45 10489.23,1398.48 10499.98,1387.74 Q1.2 10503.92,1387.74 10514.67,1376.99 10514.67,1375.02 10521.63,1368.05 R1.2 ; v1(10800,1520) 10820,1520 10840,1540 *1.5
  Bottom Layer w10: v1(10480,1440) 10560,1520 v1(10800,1520)
Net*1_6: *1.6 R7_2.2 U3_2.6 | length 1177.2
  Top Layer w10: *1.6 11286.02,1926.02 11286.02,2206.02 11489.19,2409.19 R7_2.2 ; R7_2.2@11490,2433.81 11529.41,2433.81 11539.88,2444.28 U3_2.6
Net*1_7: *1.7 R8_2.2 U3_2.5 | length 1243
  Top Layer w10: *1.7 11393.98,1933.98 11393.98,2199.06 11400,2205.09 v1(11400,2260) ; v1(11480,2520) 11482.61,2517.39 11486.73,2517.39 R8_2.2 11561.53,2474.44 U3_2.5@11572,2463.96
  Bottom Layer w10: v1(11400,2260) 11480,2340 11480,2442.31 11486.65,2448.96 11486.65,2471.04 11480,2477.69 v1(11480,2520)
Net*1_8: *1.8 R7_1.2 U3_1.6 | length 94.8
  Top Layer w10: R7_1.2@11470.5,1333.33 11509.91,1333.33 11520.38,1343.81 U3_1.6
Net*1_9: *1.9 R8_1.2 U3_1.5 | length 46.7
  Top Layer w10: R8_1.2 11542.03,1373.96 U3_1.5@11552.5,1363.49
Net*1_13: *1.13 R9_1.2 R9_2.2 U3_1.7 U3_2.7 | length 1346
  Top Layer w10: v1(11440,1460) 11480,1500 11480,1554.91 11490,1564.91 11490,1690 11540,1740 *1.13 11540,2180.17 11508.27,2211.91 11508.27,2382.07 R9_2.2 11550.79,2424.59 U3_2.7 ; v1(11459.99,1299.87) 11461.73,1301.6 11508.77,1301.6 R9_1.2 11531.29,1324.12 U3_1.7
  Bottom Layer w10: v1(11440,1460) 11440,1456.86 11459.99,1436.86 v1(11459.99,1299.87)
NetC6_1: C6.1 L1.1 U1.5 | length 287.7
  Top Layer w10: L1.1 9913.39,2133.39 9940,2160 9976.93,2160 C6.1 9981.54,2158.46 10032.58,2158.46 U1.5
NetC6_2: C6.2 U1.6 | length 54.3
  Top Layer w10: C6.2 9980.24,2122.83 10033.88,2122.83 U1.6
NetD1_2: D1.2 Q2.4 R5.2 | length 112.1
  Top Layer w10: Q2.4 10223.7,2458.11 10223.7,2423.39 R5.2 10244.37,2395.94 D1.2
NetD2_2: D2.2 J1.2 Q2.5-6-7-8 | length 394.3
  Top Layer w20: Q2.5-6-7-8 10190.52,2524.79 10355.21,2524.79 J1.2 10360,2519.7 10321.26,2480.96 D2.2
NetDS1_1: DS1.1 R?.1 | length 74.9
  Top Layer w20: DS1.1 10062.28,1629.25 10062.28,1697.72 R?.1
NetJ2_1_1: J2_1.1 U3_1.3 | length 166.6
  Top Layer w10: U3_1.3 11751.6,1343.81 J2_1.1
NetJ2_1_2: J2_1.2 U3_1.2 | length 150.4
  Top Layer w6.3: U3_1.2 11761.94,1324.12 J2_1.2@11782.1,1303.96
NetJ2_2_1: J2_2.1 U3_2.3 | length 166.6
  Top Layer w10: U3_2.3 11771.1,2444.28 J2_2.1
NetJ2_2_2: J2_2.2 U3_2.2 | length 150.4
  Top Layer w6.3: U3_2.2 11781.44,2424.59 J2_2.2@11801.6,2404.44
NetLED1_1: LED1.1 LED2.4 | length 174.6
  Top Layer w10: LED2.4 10143.44,1326.63 10176.91,1360.1 LED1.1
NetLED1_4: LED1.4 Q1.3 R2.2 | length 189.4
  Top Layer w10: LED1.4 10338.92,1326.63 10360.65,1348.37 Q1.3 10415.33,1384.98 R2.2
NetLED2_1: LED2.1 LED3.4 | length 164.6
  Top Layer w10: LED3.4 9938.44,1326.63 9971.91,1360.1 LED2.1
P3V3: C9.1 C10.1 C11.1 C12_1.2 C12_2.2 DS1.2 P1.2 P2.2 P3.2 P4.2 P5.2 Q1.1 R1.1 R3.2 R4.2 U2.5 U3_1.8 U3_2.8 | length 4186.4
  Top Layer w10: U2.5 9997.17,1692.5 9997.17,1640.24 C9.1 C10.1 C11.1 9998.42,1560 10011.45,1573.03 DS1.2 ; Q1.1 10503.92,1309 10514.67,1319.74 10514.67,1321.71 10521.63,1328.68 R1.1 10556.4,1336.44 10576.44,1336.44 10620,1380 ; v1(10620,2080) 10113.03,1573.03 DS1.2 ; v1(10660,1340) 10620,1380 ; v1(11160,1340) 11220,1340 ; v1(11220,2100) 11186.02,2133.98 11186.02,2210.39 ; P4.2 11233.5,1286.5 11233.5,1326.5 11220,1340 ; P5.2 11233.5,1393.5 11233.5,1353.5 11220,1340 ; P2.2 P3.2 11236.42,2400 11118.39,2281.97 R3.2 11118.39,2278.03 11186.02,2210.39 ; v1(11260,2240) 11215.63,2240 11186.02,2210.39 ; C12_1.2@11560.75,1259.65 U3_1.8@11560.75,1304.19 ; v1(11564.58,2355.04) 11567,2357.46 11577.59,2357.46 C12_2.2 ; C12_2.2@11580.25,2360.12 U3_2.8@11580.25,2404.66 ; DS1.2 10113.03,1520 10480,1520 10620,1380
  Bottom Layer w10: v1(10620,2080) 11196.87,2080 11216.87,2100 v1(11220,2100) ; v1(10660,1340) v1(11160,1340) ; v1(11260,2240) 11263.69,2240 11270.34,2233.35 11414.08,2233.35 11535.78,2355.04 v1(11564.58,2355.04)
P5V0: *1.Vin C1.1 C2.1 C3.1 C7.1 C8.1 L1.2 LED1.2 LED2.2 LED3.2 R2.1 U1.1 U2.1 U2.3 | length 1837.5
  Top Layer w10: LED3.2 9882.48,1360.87 9882.48,1402.6 C3.1 9881.71,1440 ; U2.1 U2.1@9997.4,1808.75 ; C7.1@10060,1852.24 10060,1953.39 L1.2 10086.61,2058.83 10106.48,2078.7 10106.48,2117.25 10111.83,2122.6 U1.1 10182.6,2122.6 *1.Vin ; LED2.2 10082.48,1360.87 10082.48,1402.6 C2.1 10080.93,1403.37 10044.29,1440 ; C8.1 10095.32,1852.24 10064.68,1852.24 C7.1 10052.44,1840 10028.65,1840 U2.1@9997.4,1808.75 ; LED1.2 10292.48,1360.87 10292.48,1402.6 C1.1 ; R2.1 10326.96,1439.68 10299.3,1412.02 10299.3,1410.87 10291.8,1403.37 C1.1 ; 9881.71,1440 9881.71,1703.11 9913.88,1735.28 9916.74,1735.28 9922.6,1741.13 U2.3 9922.6,1808.75 9943.66,1829.81 9976.34,1829.81 U2.1@9997.4,1808.75 ; 9881.71,1440 10044.29,1440 ; 10044.29,1440 10145.54,1440 10182.18,1403.37 C1.1
SCL: *1.19 P1.5 P2.5 P3.5 P4.5 P5.5 R4.1 | length 341.3
  Top Layer w6.3: R4.1 10940,2281.61 P3.5 P2.5
  Top Layer w10: R4.1 10940,2278.39 *1.19
SDA: *1.18 P1.4 P2.4 P3.4 P4.4 P5.4 R3.1 | length 341.3
  Top Layer w10: *1.18 11040,2278.39 R3.1 11040,2281.61 P3.4 P2.4
VIN: C13_1.2 C13_2.2 C14_1.2 C14_2.2 C?.1 D1.1 Q2.1 Q2.2 Q2.3 U1.2 U1.3 U3_1.1 U3_2.1 | length 689
  Top Layer w10: C?.1@10100,2307.56 10106.97,2300.59 10134.61,2300.59 10144.57,2290.63 10144.57,2324.96 10115.63,2353.9 D1.1 10115.63,2423.86 10148.82,2457.05 Q2.1 Q2.2 Q2.3 ; U1.2 U1.3 10132.1,2197.4 10137.04,2202.35 10137.04,2272.48 C?.1@10144.57,2280 ; C14_1.2 11620.5,1284.94 11631,1295.44 U3_1.1@11631,1303.94 ; C14_2.2 11640,2385.41 11650.5,2395.91 U3_2.1@11650.5,2404.41 ; U3_1.1@11649,1303.94 11649,1292.2 C13_1.2@11689.52,1251.68 ; U3_2.1@11668.5,2404.41 11668.5,2392.67 C13_2.2@11709.02,2352.15
VINUP: J1.1
pads on no net: *1.3V3 *1.10 *1.11 *1.12 *1.14 *1.15 *1.16 *1.17 *1.20 *1.21 *1.22 *1.23 LED3.1 P1.1 P1.7 P2.1 P2.7 P3.1 P3.7 P4.1 P4.7 P5.1 P5.7 U2.4

## Polygon pours and split planes (outlines as drawn)
GND on Bottom Layer "GND_L02_P000" (solid, pour order 0): 12320,670 8990,670 8990,3530 9120,3660 12380,3660 12380,610

## Silkscreen, mask and mechanical layers (free items; w line width, h text height)
Mechanical 1:
  the board outline again, w10